# Altium PCB UHF_Reader_MultiFunction_V4.PcbDoc (part 3 of 3)
Units mm, origin at the board's own origin, x right, y up, seen from the top; angles counter-clockwise.
Board outline 74.4 x 63.4 mm, 6 copper layers (Top Layer, Internal Plane 1, Signal Layer 1, Signal Layer 2, Signal Layer 3, Bottom Layer), stack 1.21 mm thick; 381 components, 239 nets, 1152 pads, 1873 vias.
Unrouted connection lines stored in the file: 49.
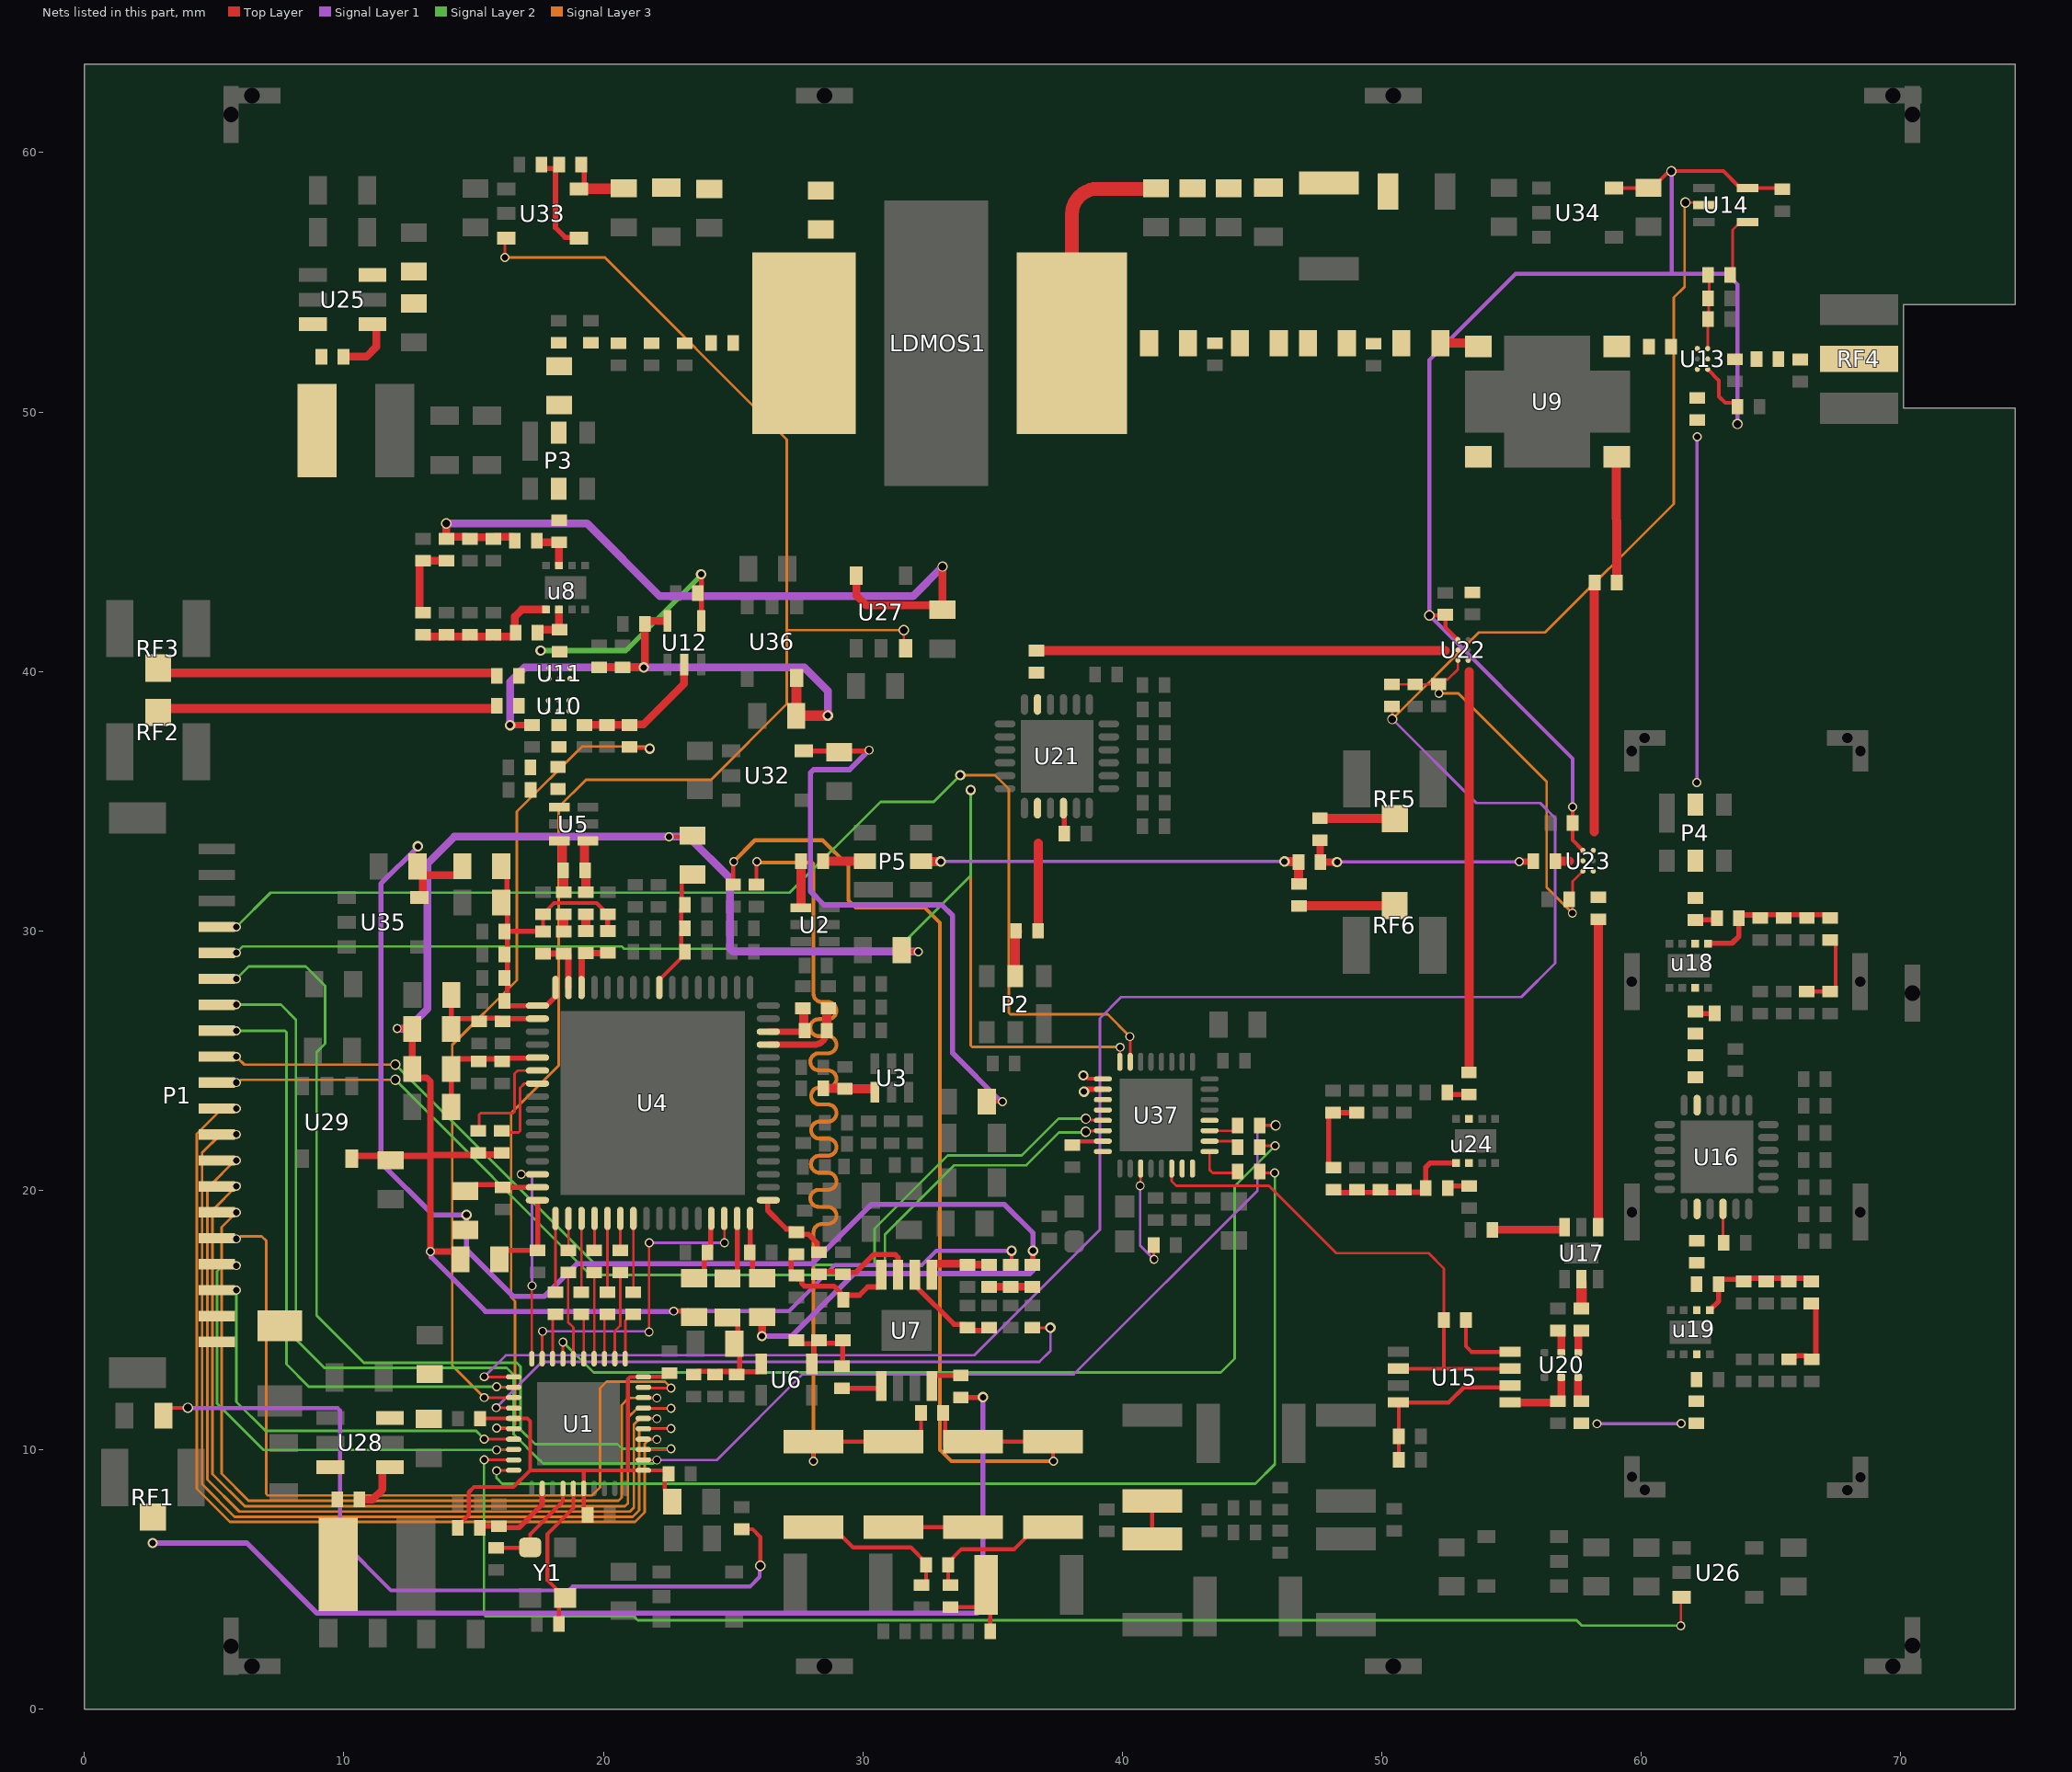
[diagram p7: the nets of this part, all layers, seen from the top]

## Via types
v1: diameter 0.4, hole 0.25, Top Layer to Bottom Layer, tented both sides, 1555 vias
v2: diameter 0.4, hole 0.25, Top Layer to Bottom Layer, tented top, 149 vias
v3: diameter 0.35, hole 0.25, Top Layer to Bottom Layer, tented both sides, 117 vias
v4: diameter 0.4, hole 0.25, Top Layer to Bottom Layer, 32 vias
v5: diameter 0.4, hole 0.3, Top Layer to Bottom Layer, tented both sides, 12 vias
v6: diameter 0.4, hole 0.3, Top Layer to Bottom Layer, 4 vias
v7: diameter 2.8, hole 2.1, Top Layer to Bottom Layer, 4 vias

## Nets (pads, with @x,y where several pads share a name; then routed paths per layer and width w, separated by ;. In a path a pad name is that pad's centre, name@x,y a point inside that pad or via, vN(x,y) a via of type N, cw(c..) or ccw(c..) an arc to the next point about the centre after c; other vN are vias at no path point) (continued)
NetC37_2: C37.2 C41.2 L17.1 L19.1 | length 41.3
  Top Layer w0.15: C37.2@25.899,31.784 25.899,32.66 v3(25.912,32.674) ; v3(28.099,9.557) 28.098,9.558 L17.1@28.098,10.313 L19.1@31.175,10.313 ; L19.1@32.048,10.023 32.24,10.215 C41.2@32.24,11.517
  Signal Layer 3 w0.15: v3(25.912,32.674) 25.953,32.634 28.041,32.634 28.099,32.575 28.099,27.659 28.099,27.584 ccw(c28.428,27.584) 28.428,27.255 28.655,27.255 cw(c28.655,26.926) 28.984,26.926 cw(c28.655,26.926) 28.655,26.597 28.305,26.597 ccw(c28.305,26.268) 27.976,26.268 ccw(c28.305,26.268) 28.305,25.939 28.655,25.939 cw(c28.655,25.61) 28.984,25.61 cw(c28.655,25.61) 28.655,25.281 28.305,25.281 ccw(c28.305,24.952) 27.976,24.952 ccw(c28.305,24.952) 28.305,24.623 28.655,24.623 cw(c28.655,24.294) 28.984,24.294 cw(c28.655,24.294) 28.655,23.965 28.334,23.965 ccw(c28.334,23.636) 28.005,23.636 ccw(c28.334,23.636) 28.334,23.307 28.655,23.307 cw(c28.655,22.978) 28.984,22.978 cw(c28.655,22.978) 28.655,22.649 28.334,22.649 ccw(c28.334,22.32) 28.005,22.32 ccw(c28.334,22.32) 28.334,21.991 28.655,21.991 cw(c28.655,21.662) 28.984,21.662 cw(c28.655,21.662) 28.655,21.333 28.331,21.333 ccw(c28.331,21.004) 28.002,21.004 ccw(c28.331,21.004) 28.331,20.675 28.655,20.675 cw(c28.655,20.346) 28.984,20.346 cw(c28.655,20.346) 28.655,20.017 28.305,20.017 ccw(c28.305,19.688) 27.976,19.688 ccw(c28.305,19.688) 28.305,19.359 28.655,19.359 cw(c28.655,19.03) 28.984,19.03 cw(c28.655,19.03) 28.655,18.701 28.428,18.701 ccw(c28.428,18.372) 28.099,18.372 28.099,17.898 v3(28.099,9.557)
NetC38_1: C38.1 C40.2 L17.2 | length 5.8
  Top Layer w0.15: L17.2@28.098,7.013 28.84,7.013 29.621,6.232 31.849,6.232 32.439,5.643 C40.2@32.439,5.561 32.439,4.963 C38.1@32.255,4.779
NetC39_2: C39.2 L16.1 U3.4 | length 2
  Top Layer w0.25: L16.1@29.291,23.93 L16.1@29.31,23.91 ; U3.4@30.338,23.91 U3.4@30.464,23.784
  Top Layer w0.353: C39.2@28.475,23.93 L16.1@29.291,23.93 ; L16.1@29.31,23.91 U3.4@30.338,23.91
NetC40_1: C40.1 C48.1 L22.2 | length 5.5
  Top Layer w0.15: C48.1@33.375,4.779 33.289,4.866 C40.1@33.289,5.561 33.289,5.649 33.807,6.168 35.835,6.168 36.681,7.013 L22.2@37.328,7.013
NetC41_1: C41.1 C47.2 L20.2 L22.1 | length 41.4
  Top Layer w0.15: C47.2@25.004,31.784 25.004,32.654 v3(25.023,32.674) ; C41.1@33.09,11.517 33.177,11.43 33.177,10.147 L20.2@33.188,10.136 ; L20.2@34.251,10.313 L22.1@37.328,10.313 37.328,9.575 v3(37.342,9.56)
  Signal Layer 3 w0.15: v3(25.023,32.674) 25.839,33.49 28.452,33.49 29.439,32.503 29.439,31.182 29.725,30.896 32.389,30.896 32.975,30.31 32.975,9.995 33.41,9.56 v3(37.342,9.56)
NetC43_2: C43.2 L21.2 U4.48 | length 2.6
  Top Layer w0.2: U4.48@25.657,18.915 25.657,17.631 C43.2@25.637,17.611 25.752,17.495 25.752,16.86 26.002,16.61 L21.2@26.119,16.61
NetC44_1: C44.1 C48.2 L23.1 | length 2.4
  Top Layer w0.15: C48.2@33.375,3.929 34.794,3.929 34.912,3.811 C44.1@34.912,2.994
NetC49_2: C49.2 L24.2 U4.45 | length 2.6
  Top Layer w0.2: L24.2@23.604,16.611 23.643,16.611 23.892,16.86 23.892,17.486 24.134,17.728 24.134,18.554 24.157,18.577 U4.45@24.157,18.915
NetC50_2: C50.2 C51.2 C52.2 L25.2 U4.8 | length 5.3
  Top Layer w0.15: U4.8@22.157,27.815 22.157,28.115 23.147,29.105 C52.2@23.147,29.196 23.004,29.339 23.004,29.954 C51.2@23.147,30.097 23.004,30.241 23.004,30.851 C50.2@23.147,30.995 23.018,31.124 23.018,31.896 23.293,32.171 L25.2@23.439,32.171
NetC55_1: C55.1 L28.1 U4.14 | length 2.4
  Top Layer w0.25: U4.14@19.157,27.815 C55.1@19.157,29.133 ; C55.1@19.177,29.133 C55.1@19.239,29.195 ; C55.1@19.239,29.053 C55.1@19.327,29.141 19.332,29.145 L28.1@20.172,29.145
NetC55_2: C55.2 L26.2 | length 0.7
  Top Layer w0.2: L26.2@19.324,30.644 L26.2@19.327,30.641
  Top Layer w0.353: C55.2@19.327,29.991 L26.2@19.327,30.641
NetC56_1: C56.1 L26.1 U5.4 | length 1.8
  Top Layer w0.2: C56.1@19.277,32.226 C56.1@19.304,32.199
  Top Layer w0.353: C56.1@19.277,32.326 U5.4@19.277,33.356 ; L26.1@19.324,31.494 C56.1@19.324,32.199
NetC56_2: C56.2 L27.1 U5.3 | length 1.8
  Top Layer w0.25: C56.2@18.427,32.226 C56.2@18.461,32.192
  Top Layer w0.353: C56.2@18.427,32.326 U5.3@18.427,33.37 ; L27.1@18.481,31.492 C56.2@18.481,32.192
NetC57_1: C57.1 L29.1 U4.15 | length 2.2
  Top Layer w0.25: L29.1@17.677,29.123 C57.1@18.472,29.123 C57.1@18.584,29.011 ; U4.15@18.657,27.815 C57.1@18.657,29.1
NetC57_2: C57.2 L27.2 | length 0.7
  Top Layer w0.25: L27.2@18.472,30.633 L27.2@18.481,30.642
  Top Layer w0.353: C57.2@18.472,29.973 L27.2@18.472,30.633
NetC58_1: C58.1 C59.2 C60.1 C61.2 C62.2 C63.2 C64.1 L28.2 L29.2 L30.2 U4.16 U4.17 | length 13.6
  Top Layer w0.15: C59.2@17.676,30.644 C59.2@17.676,30.644 17.677,30.201 ; C59.2@17.676,30.644 18.101,31.069 19.742,31.069 C60.1@20.167,30.644 ; C60.1@20.172,30.624 C60.1@20.172,30.644
  Top Layer w0.2: L30.2@16.065,32.487 16.29,32.262 16.29,31.323 C61.2@16.062,31.095 16.3,30.857 16.3,30.169 C62.2@16.185,30.053 ; U4.17@17.156,27.113 16.363,27.113 C64.1@16.185,27.291 16.308,27.414 16.308,28.064 C58.1@16.185,28.187 16.308,28.31 16.308,28.959 C63.2@16.185,29.082 16.3,29.198 16.3,29.863 C62.2@16.185,29.978 L29.2@17.671,29.978 ; U4.17@17.457,27.115 17.808,27.115 18.157,27.465 U4.16@18.157,27.815 ; L28.2@20.091,30.076 L28.2@20.172,29.995 ; L28.2@20.172,29.879 L28.2@20.172,29.995 ; C60.1@20.172,30.624 L28.2@20.172,29.995
NetC65_1: C65.1 L31.2 U4.32 | length 3.6
  Top Layer w0.2: L31.2@15.99,17.337 15.99,17.433 16.24,17.683 C65.1@17.47,17.683 17.47,19.602 U4.32@17.457,19.615
NetC66_2: C66.2 C67.2 C68.2 C69.2 L34.2 U6.4 | length 5.4
  Top Layer w0.2: C67.2@23.481,12.902 23.605,13.026 24.107,13.026 C68.2@24.231,12.902 ; C68.2@24.306,12.902 24.42,13.015 25.018,13.015 C66.2@25.132,12.902 C66.2@25.234,13.004 ; L34.2@24.884,15.1 24.932,15.1 25.182,14.85 25.182,14.223 C69.2@25.048,14.088 25.146,13.99 25.257,13.878 25.257,13.005 25.962,13.005 26.082,13.125 U6.4@26.082,13.301
NetC70_2: C70.2 C71.2 C72.2 L32.2 U4.18 | length 4.7
  Top Layer w0.2: L32.2@14.134,26.22 14.134,26.37 14.384,26.62 14.534,26.62 15.101,26.621 C71.2@15.208,26.514 15.323,26.629 15.995,26.629 C72.2@16.11,26.514 16.212,26.615 U4.18@17.457,26.615 ; L32.2@14.139,26.613 C70.2@14.139,27.53
NetC73_1: C73.1 L33.2 U4.31 | length 2.8
  Top Layer w0.2: L33.2@14.88,19.974 14.88,20.023 15.08,20.223 15.997,20.223 C73.1@16.109,20.111 ; C73.1@16.109,20.115 U4.31@17.457,20.115
NetC75_2: C75.2 C76.2 C77.2 L35.2 U4.21 | length 5.2
  Top Layer w0.2: C75.2@14.134,23.216 L35.2@14.134,24.677 ; L35.2@14.134,24.719 14.134,24.815 14.384,25.065 15.102,25.065 C76.2@15.201,24.966 15.3,25.065 16.005,25.065 C77.2@16.103,24.967 ; C77.2@16.107,24.963 16.236,25.091 17.094,25.091 17.119,25.115 U4.21@17.457,25.115
NetC78_2: C78.2 R19.2 U7.1 | length 2.6
  Top Layer w0.3: U7.1@32.658,16.751 32.658,17.126 32.708,17.176 33.979,17.176 C78.2@34.028,17.127 R19.2@34.869,17.127
NetC79_1: C79.1 RF1.1 | length 42.2
  Top Layer w0.2: C79.1@33.777,12.017 34.623,12.017 v1(34.632,12.026)
  Signal Layer 1 w0.2: v1(2.632,6.401) 6.257,6.401 8.958,3.7 34.406,3.7 34.632,3.926 v1(34.632,12.026)
NetC79_2: C79.2 U7.8 | length 1.5
  Top Layer w0.2: U7.8@32.658,12.451 32.658,12.767 32.758,12.867 33.716,12.867 C79.2@33.782,12.801
NetC80_1: C80.1 C82.2 U7.3 | length 4.2
  Top Layer w0.2: C82.2@28.313,16.76 28.419,16.866 29.121,16.866 C80.1@29.227,16.76 ; C80.1@29.227,16.701 29.361,16.835 29.733,16.835 30.424,17.526 31.24,17.526 31.357,17.409 U7.3@31.357,16.751
NetC81_2: C81.2 R18.2 U7.2 | length 4
  Top Layer w0.2: U7.2@32.008,16.751 32.108,16.651 32.108,16.243 33.517,14.834 33.914,14.834 34.156,14.592 34.752,14.592 R18.2@34.868,14.709
NetC83_2: C83.2 C85.2 R20.2 U7.4 | length 5.8
  Top Layer w0.2: 27.237,17.293 27.237,16.959 27.239,16.957 27.239,16.842 27.364,16.717 27.514,16.717 R20.2@27.639,16.592 ; 27.238,17.294 27.238,17.41 27.363,17.535 C83.2@27.438,17.535 ; R20.2@27.466,16.601 27.475,16.592 R20.2@27.639,16.592 ; U7.4@30.707,16.751 30.707,16.376 30.607,16.276 30.19,16.276 29.871,15.956 29.373,15.956 29.248,15.831 C85.2@29.248,15.782 29.123,15.907 29.123,16.068 28.891,16.301 27.756,16.301 27.639,16.418 R20.2@27.639,16.592
NetC84_1: C84.1 U7.5 | length 1.4
  Top Layer w0.2: C84.1@29.202,12.367 30.598,12.367 U7.5@30.607,12.376
NetC87_1: C87.1 R25.1 R26.1 | length 3.1
  Top Layer w0.3: R26.1@13.049,42.262 12.995,42.262 12.92,42.337 12.92,44.188 12.995,44.263 13.208,44.263 R25.1@13.952,44.263
NetC88_2: C88.2 C90.2 C93.2 L36.2 R26.2 u8.1 | length 6
  Top Layer w0.3: R26.2@13.049,41.412 13.123,41.338 13.878,41.338 C88.2@13.952,41.412 14.026,41.338 14.78,41.338 C90.2@14.854,41.412 14.928,41.338 15.682,41.338 C93.2@15.756,41.412 15.83,41.338 16.467,41.338 16.475,41.345 16.541,41.345 16.616,41.42 L36.2@16.616,41.495 ; L36.2@16.591,41.359 16.591,42.117 16.855,42.381 u8.1@17.792,42.381
NetC89_2: C89.2 C91.2 C197.1 L37.2 R25.2 U27.5 | length 30.2
  Top Layer w0.3: v5(13.949,45.701) 13.951,45.7 13.951,45.221 R25.2@13.952,45.113 R25.2@13.952,45.113 14.027,45.188 14.272,45.188 14.278,45.193 14.699,45.193 14.779,45.113 C91.2@14.854,45.113 14.92,45.179 15.69,45.179 C89.2@15.756,45.113 15.831,45.188 16.076,45.188 16.082,45.193 16.516,45.193 16.591,45.118 L37.2@16.591,45.046 ; U27.5@29.749,43.69 29.749,42.925 30.125,42.55 32.896,42.55 C197.1@33.069,42.377 33.076,42.384 v5(33.076,44.043)
  Signal Layer 1 w0.3: v5@13.996,45.701 19.374,45.701 22.175,42.9 31.933,42.9 33.058,44.025 v5@33.1,44.025
NetC92_2: C92.2 C95.2 C209.1 R28.2 RX1.2 U33.5 | length 2.3
  Top Layer w0.2: RX1.2@19.257,59.49 19.257,58.75 U33.5@19.405,58.602
  Top Layer w0.4: U33.5@19.405,58.602 C209.1@20.766,58.602 ; C209.1@20.893,58.602 C209.1@20.909,58.619
NetC94_1: C94.1 C96.2 C97.1 C98.2 C99.2 L38.1 LDMOS1.1 R27.2 | length 8.5
  Top Layer w0.53: LDMOS1.1@38.056,52.645 38.056,57.611 cw(c39.048,57.611) 39.048,58.602 41.031,58.602 ccw(c41.031,58.623) C98.2@41.051,58.623
NetC100_2: C100.2 C108.1 L38.2
NetC101_1: C101.1 U9.4
NetC104_1: C104.1 L36.1 u8.2 | length 1.7
  Top Layer w0.3: L36.1@17.441,41.434 17.441,41.509 17.541,41.61 18.292,41.61 u8.2@18.292,42.381
NetC104_2: C104.2 U11.5
NetC105_1: C105.1 P3.5
NetC105_2: C105.2 L37.1 u8.7 | length 1.8
  Top Layer w0.3: L37.1@17.441,45.046 17.506,44.98 C105.2@18.289,44.98 18.292,44.977 u8.7@18.292,44.081
NetC106_1: C106.1 P3.2
NetC106_2: C106.2 C107.1 C110.1 C111.1 C113.2 C114.2 C115.2
NetC107_2: C107.2 LDMOS1.2 R28.1
NetC108_2: C108.2 L39.1
NetC109_1: C109.1 C112.1 L39.2
NetC109_2: C109.2 U9.1 | length 1.1
  Top Layer w0.353: C109.2@52.259,52.652 U9.1@53.406,52.652
NetC116_1: C116.1 U10.5
NetC116_2: C116.2 R29.2 R31.2
NetC117_2: C117.2 U9.2
NetC120_1: C120.1 RF2.1 | length 13.2
  Top Layer w0.353: RF2.1@2.837,38.423 2.985,38.571 15.85,38.571 15.898,38.62 C120.1@15.898,38.682
NetC120_2: C120.2 U10.3
NetC121_1: C121.1 RF3.1 | length 13.3
  Top Layer w0.353: RF3.1@2.757,40.076 2.89,39.943 15.85,39.943 15.898,39.895 C121.1@15.898,39.832
NetC121_2: C121.2 U11.1
NetC124_1: C124.1 U13.3
NetC124_2: C124.2 P4.2 | length 13.4
  Top Layer w0.15: P4.2@62.085,34.857 P4.2@62.137,34.909
  Signal Layer 1 w0.121: v3(62.137,35.722) 62.148,35.733 62.148,49.032 v3(62.159,49.043)
NetC125_1: C125.1 C127.2 U13.5
NetC126_1: C126.1 C127.1 RF4.1
NetC134_2: C134.2 R37.1 U15.2 U15.8 | length 7
  Top Layer w0.15: R37.1@50.656,9.605 50.656,11.696 50.531,11.82 52.581,11.82 53.164,12.403 U15.2@55.065,12.403
NetC136_1: C136.1 R38.1 R40.1 | length 3.1
  Top Layer w0.15: R38.1@66.385,27.662 67.342,27.662 67.492,27.812 67.492,29.495 67.342,29.645 R40.1@67.285,29.645
NetC137_1: C137.1 R39.1 R41.1 | length 3.3
  Top Layer w0.2: R39.1@65.695,13.48 65.82,13.605 65.998,13.605 66.012,13.619 66.352,13.619 66.491,13.48 C137.1@66.566,13.48 ; R41.1@66.554,15.639 66.608,15.639 66.733,15.514 66.733,13.605 C137.1@66.608,13.48
NetC140_2: C140.2 U15.4 | length 3
  Top Layer w0.15: C140.2@53.247,15.002 53.247,13.984 53.461,13.77 U15.4@55.131,13.77
NetC141_2: C141.2 C145.2 C149.2 L40.2 R40.2 u18.1 | length 5.9
  Top Layer w0.2: u18.1@62.584,29.498 62.606,29.52 63.5,29.52 63.768,29.788 L40.2@63.768,30.492 63.888,30.612 64.472,30.612 C149.2@64.589,30.495 64.714,30.62 64.905,30.62 ; 64.906,30.621 65.287,30.621 65.412,30.495 C145.2@65.487,30.495 65.612,30.62 65.804,30.62 ; 65.804,30.621 66.185,30.621 66.311,30.495 C141.2@66.386,30.495 66.511,30.62 66.703,30.62 ; 66.703,30.621 67.084,30.621 67.21,30.495 R40.2@67.285,30.495
NetC142_2: C142.2 C146.2 C150.2 L41.2 R41.2 u19.1 | length 5.2
  Top Layer w0.2: u19.1@62.642,15.38 62.988,15.726 L41.2@62.988,16.376 62.988,16.443 63.113,16.568 63.876,16.568 C150.2@63.955,16.489 64.079,16.613 64.698,16.613 C146.2@64.821,16.489 64.945,16.613 65.564,16.613 C142.2@65.688,16.489 65.812,16.613 66.431,16.613 R41.2@66.555,16.489
NetC151_2: C151.2 U17.6 | length 2.8
  Top Layer w0.3: C151.2@54.262,18.477 54.263,18.476 U17.6@57.045,18.476
NetC153_1: C153.1 L40.1 u18.2 | length 0.9
  Top Layer w0.2: C153.1@62.093,30.42 62.847,30.42 L40.1@62.918,30.492
NetC154_1: C154.1 C155.2 | length 0.1
  Top Layer w0.23: C155.2@62.071,25.218 C155.2@62.13,25.158
NetC154_2: C154.2 L42.1 u18.7 | length 0.8
  Top Layer w0.2: C154.2@62.084,26.816 L42.1@62.836,26.817
NetC155_1: C155.1 U16.5
NetC156_1: C156.1 L41.1 u19.2
NetC156_2: C156.2 U16.14
NetC157_1: C157.1 C158.2 | length 3.3
  Top Layer w0.23: C158.2@57.699,11.02 C158.2@57.719,11.001
  Signal Layer 1 w0.121: v3@58.298,11.009 v3(61.544,11.009)
  Signal Layer 1 w0.23: v3(58.29,11.001) v3@58.298,11.009
NetC157_2: C157.2 L43.1 u19.7
NetC158_1: C158.1 U20.1 | length 1
  Top Layer w0.3: U20.1@57.568,12.787 57.568,12.002 C158.1@57.699,11.87
NetC159_1: C159.1 U17.2 | length 1
  Top Layer w0.4: U17.2@57.695,16.476 57.7,16.471 C159.1@57.7,15.486
NetC159_2: C159.2 U20.6 | length 0.9
  Top Layer w0.3: U20.6@57.574,13.744 57.574,14.536 57.629,14.59 C159.2@57.699,14.59
NetC160_2: C160.2 U17.4 | length 11.9
  Top Layer w0.353: U17.4@58.348,18.579 C160.2@58.348,30.441
NetC168_1: C168.1 R44.1 R45.1 | length 3.2
  Top Layer w0.2: R45.1@48.138,20.871 48.076,20.871 47.951,20.996 47.951,22.868 48.076,22.993 R44.1@49.037,22.993
NetC169_2: C169.2 C171.2 C177.2 L44.2 R45.2 u24.1 | length 6
  Top Layer w0.2: R45.2@48.138,20.021 48.254,19.906 48.928,19.906 C169.2@49.044,20.021 49.149,19.917 49.845,19.917 C171.2@49.95,20.021 50.066,19.906 50.74,19.906 C177.2@50.856,20.021 50.949,19.928 51.567,19.928 51.692,20.053 51.692,20.886 51.853,21.047 u24.1@52.856,21.047
NetC176_1: C176.1 U23.3 | length 9.6
  Top Layer w0.353: 58.192,33.817 58.192,43.409 C176.1@58.208,43.425
NetC178_1: C178.1 U21.5
NetC178_2: C178.2 U22.5 | length 15.8
  Top Layer w0.353: C178.2@36.691,40.8 52.457,40.8
NetC179_1: C179.1 P2.5 | length 1.8
  Top Layer w0.353: P2.5@35.881,28.248 35.881,29.899 cw(c35.957,29.899) C179.1@35.957,29.976
NetC179_2: C179.2 U21.14 | length 3.4
  Top Layer w0.353: C179.2@36.757,30.001 36.757,33.376
NetC180_1: C180.1 U2.1 | length 1.8
  Top Layer w0.353: U2.1@27.614,30.889 27.614,32.685 C180.1@27.618,32.689
NetC180_2: C180.2 P5.2 | length 1.6
  Top Layer w0.353: C180.2@28.468,32.689 30.081,32.689 P5.2@30.087,32.683
NetC181_1: C181.1 R46.1 R49.2 | length 9
  Top Layer w0.24: v3(55.303,32.672) C181.1@55.822,32.672
  Top Layer w0.28: R46.1@47.619,33.491 47.63,33.48 47.63,32.62 R49.2@47.65,32.6 ; R49.2@47.641,32.656 48.219,32.656 v1@48.225,32.65
  Signal Layer 1 w0.121: v1(48.275,32.65) 48.286,32.661 55.289,32.661 v3@55.3,32.65
NetC181_2: C181.2 U23.5 | length 0.5
  Top Layer w0.353: C181.2@56.688,32.682 57.228,32.682
NetC182_1: C182.1 L44.1 u24.2 | length 0.9
  Top Layer w0.2: L44.1@52.542,20.091 52.612,20.161 C182.1@53.37,20.161
NetC183_1: C183.1 U22.1 | length 15.5
  Top Layer w0.353: C183.1@53.361,24.543 53.361,39.997
NetC183_2: C183.2 L45.1 u24.7 | length 0.9
  Top Layer w0.2: L45.1@52.532,23.765 52.604,23.693 C183.2@53.361,23.693
NetC186_1: C186.1 L46.2 U25.6
NetC186_2: C186.2 U25.1 | length 2.4
  Top Layer w0.3: C186.2@9.984,52.129 10.87,52.129 11.253,52.512 11.253,53.228 U25.1@11.101,53.38
NetC193_1: C193.1 L47.2 U28.6
NetC193_2: C193.2 U28.1 | length 2.2
  Top Layer w0.3: C193.2@10.591,8.081 11.106,8.081 11.485,8.46 11.485,9.209 11.683,9.408 U28.1@11.77,9.408
NetC207_1: C207.1 L4.2 U32.5 | length 23.9
  Top Layer w0.15: L4.2@34.922,23.414 34.923,23.413 v3(35.387,23.413)
  Top Layer w0.2: U32.5@27.722,36.934 v3@30.209,36.934
  Signal Layer 1 w0.2: v3(30.24,36.965) 29.487,36.211 28.1,36.211 27.982,36.094 27.982,31.526 28.507,31.002 33.046,31.002 33.457,30.59 33.457,25.291 v3@35.311,23.437
NetD1_1: D1.1 R52.1 | length 31.2
  Top Layer w0.15: D1.1@3.246,11.615 v5(3.982,11.615) ; R52.1@25.325,6.936 25.751,6.936 26.05,6.637 v5(26.05,5.526)
  Signal Layer 1 w0.15: v5(3.982,11.615) 3.996,11.601 9.762,11.601 9.85,11.513 9.85,6.539 11.813,4.576 18.657,4.576 18.806,4.725 25.649,4.725 26.025,5.101 26.025,5.501 v5(26.05,5.526)
NetF1_1: F1.1 P1.1 P1.2
NetL9_2: L9.2 L12.1 | length 1.5
  Top Layer w0.15: L9.2@41.152,6.564 L12.1@41.152,8.029
NetL19_2: L19.2 L20.1 | length 3.1
  Top Layer w0.15: L19.2@31.175,7.013 L20.1@34.251,7.013
NetP5_5: P5.5 R48.1 R49.1 | length 15.2
  Top Layer w0.353: P5.5@32.237,32.683 32.245,32.675 v1@32.9,32.675 ; v1@46.35,32.675 46.772,32.675 R49.1@46.791,32.656 46.798,32.648 46.798,31.827 R48.1@46.825,31.8
  Signal Layer 1 w0.121: v1@33.025,32.7 33.05,32.675 v1(46.25,32.675)
  other v1: 33,32.675
NetR1_1: R1.1 U1.37 | length 36.7
  Top Layer w0.1: U1.37@18.442,13.506 18.442,14.149 v3(18.445,14.152) ; R1.1@45.295,21.669 45.343,21.717 v3(45.891,21.717)
  Signal Layer 2 w0.1: v3(18.445,14.152) 19.621,12.976 43.794,12.976 44.327,13.51 44.327,20.153 v3(45.891,21.717)
NetR2_2: R2.2 U1.10 | length 43.3
  Top Layer w0.1: v3@15.763,9.193 15.776,9.206 U1.10@16.542,9.206 ; R2.2@45.295,20.724 45.344,20.675 v3(45.873,20.675)
  Signal Layer 2 w0.1: v3(15.879,9.193) 15.879,8.909 16.098,8.69 45.13,8.69 45.882,9.442 v3@45.882,20.659
NetR5_2: R5.2 U4.39 | length 2.9
  Top Layer w0.1: R5.2@21.113,16.074 21.157,16.118 U4.39@21.157,18.915
NetR6_2: R6.2 U4.38 | length 1.2
  Top Layer w0.1: R6.2@20.65,17.683 20.657,17.69 U4.38@20.657,18.915
NetR7_2: R7.2 U4.37 | length 2.9
  Top Layer w0.1: R7.2@20.132,16.074 20.157,16.099 U4.37@20.157,18.915
NetR8_2: R8.2 U4.36 | length 1.2
  Top Layer w0.1: R8.2@19.648,17.683 19.657,17.692 U4.36@19.657,18.915
NetR9_2: R9.2 U4.35 | length 2.8
  Top Layer w0.1: R9.2@19.15,16.074 19.157,16.081 U4.35@19.157,18.915
NetR10_2: R10.2 U4.34 | length 1.2
  Top Layer w0.1: R10.2@18.645,17.683 18.657,17.695 U4.34@18.657,18.915
NetR11_1: R11.1 U1.38 | length 1.8
  Top Layer w0.1: U1.38@18.042,13.506 18.042,15.117 R11.1@18.149,15.224
NetR11_2: R11.2 U4.33 | length 2.8
  Top Layer w0.1: R11.2@18.157,16.085 U4.33@18.157,18.915
NetR12_2: R12.2 U4.22 | length 4.4
  Top Layer w0.1: R12.2@15.208,22.292 15.208,22.916 15.266,22.975 16.522,22.975 16.581,23.034 16.581,24.499 16.697,24.615 U4.22@17.457,24.615
NetR13_2: R13.2 U4.23 | length 3.1
  Top Layer w0.1: R13.2@16.072,22.225 16.735,22.225 16.794,22.284 16.794,23.95 16.959,24.115 U4.23@17.457,24.115
NetR16_2: R16.2 R17.2 R19.1 | length 1.6
  Top Layer w0.3: R19.1@34.909,16.268 34.918,16.277 R16.2@36.527,16.277
NetR22_1: R22.1 U1.4 | length 24.5
  Top Layer w0.1: v3(15.867,11.62) 15.876,11.611 16.507,11.611 U1.4@16.51,11.608 ; R22.1@36.528,14.709 36.535,14.702 37.19,14.702 v1@37.211,14.681
  Signal Layer 1 w0.1: v3(15.867,11.62) 17.632,13.386 36.805,13.386 37.231,13.813 37.231,14.676 v1@37.262,14.707
  other v1: 37.231,14.702
NetR24_1: R24.1 U1.3 | length 32.3
  Top Layer w0.1: v3(15.412,12.011) 15.414,12.009 16.555,12.009 U1.3@16.561,12.014 ; R24.1@21.002,37.085 21.063,37.024 21.777,37.024 v1@21.793,37.008
  Signal Layer 3 w0.1: v3(15.412,12.011) 14.173,13.25 14.173,25.604 16.662,28.094 16.662,34.595 19.177,37.109 21.576,37.109 21.605,37.081 21.728,37.081 v1(21.785,37.024)
NetR29_1: R29.1 R30.2 U5.1
NetR36_1: R36.1 U15.1 U20.2 | length 2.8
  Top Layer w0.3: U15.1@54.942,11.825 56.745,11.825 R36.1@56.79,11.87 56.921,12.001 U20.2@56.921,12.791
NetR42_2: R42.2 U20.5 | length 0.9
  Top Layer w0.3: R42.2@56.79,14.59 56.921,14.459 U20.5@56.921,13.741
NetR43_1: R43.1 U16.16 | length 1.3
  Top Layer w0.1: U16.16@63.153,19.283 63.153,18.002 R43.1@63.175,17.98
NetR46_2: R46.2 RF5.1 | length 2.9
  Top Layer w0.353: R46.2@47.6,34.35 47.616,34.334 50.498,34.334 RF5.1@50.505,34.328
NetR47_1: R47.1 U21.16 | length 1
  Top Layer w0.2: U21.16@37.732,34.728 37.732,34.446 37.766,34.412 R47.1@37.766,33.756
NetR48_2: R48.2 RF6.1 | length 3.7
  Top Layer w0.353: R48.2@46.806,30.959 46.812,30.966 50.409,30.966 RF6.1@50.45,30.925
NetR50_1: R50.1 R51.2 U25.3
NetR53_1: R53.1 R54.2 U28.3
NetR57_2: R57.2 U37.31 | length 1.4
  Top Layer w0.15: R57.2@38.008,21.894 R57.2@38.091,21.811 ; R57.2@38.098,21.77 R57.2@38.069,21.741 38.213,21.885 38.977,21.885 38.987,21.894 U37.31@39.25,21.894
NetRX1_1: RX1.1 RX2.1 U33.4 | length 4.2
  Top Layer w0.2: RX2.1@17.616,59.533 17.616,59.511 17.741,59.386 RX1.1@18.152,59.386 ; RX1.1@18.298,59.532 RX1.1@18.152,59.386 ; U33.4@19.057,56.701 19.027,56.732 18.525,56.732 18.152,57.104 RX1.1@18.152,59.386
NetU1_9: U1.9 U26.3 | length 54.5
  Top Layer w0.1: v3(15.412,9.612) 15.418,9.606 U1.9@16.542,9.606 ; v3(61.529,3.218) 61.529,4.285 U26.3@61.561,4.317
  Signal Layer 2 w0.1: v3(15.412,9.612) 15.401,9.602 15.401,3.635 15.46,3.576 21.177,3.576 21.327,3.426 57.509,3.426 57.713,3.221 58.381,3.221 58.382,3.223 v3@61.525,3.223
NetU10_1: U10.1 U11.3
NIRQ0: U1.40 U4.30 | length 8.1
  Top Layer w0.1: v3(16.833,20.614) 17.363,20.614 17.377,20.6 17.425,20.648 U4.30@17.457,20.615 ; U1.40@17.242,13.506 17.244,13.508 17.244,16.318 v3(17.246,16.32)
  Signal Layer 1 w0.1: v3(16.833,20.614) 17.108,20.614 17.246,20.476 v3(17.246,16.32)
NRST: R56.1 U37.3 | length 4.3
  Top Layer w0.1: v3(40.688,20.169) 40.707,20.188 U37.3@40.707,20.837 ; R56.1@41.211,17.892 41.211,17.347 v3(41.222,17.336)
  Signal Layer 1 w0.1: v3(40.688,20.169) 40.688,17.87 41.182,17.376 v3@41.182,17.276
OSC_IN: C7.2 U1.14 Y1.1 | length 4.1
  Top Layer w0.15: C7.2@15.873,6.217 17.16,6.217 Y1.1@17.179,6.235 17.179,6.744 18.442,8.007 U1.14@18.442,8.506
OSC_OUT: C6.1 U1.15 Y1.3 | length 6
  Top Layer w0.15: C6.1@18.288,3.28 18.288,4.044 Y1.3@18.529,4.285 17.848,4.966 17.848,6.752 18.842,7.747 U1.15@18.842,8.506
PA0: C140.1 U15.3 U15.6 U37.6 | length 20.8
  Top Layer w0.1: U37.6@41.907,20.837 41.907,20.347 42.085,20.169 45.65,20.169 48.243,17.576 51.804,17.576 52.397,16.983 C140.1@52.397,15.002
  Top Layer w0.15: U15.6@50.531,13.12 52.397,13.12 U15.3@55.131,13.12 ; 52.389,13.133 52.397,13.14 52.397,14.922 C140.1@52.397,15.002
PA1: U37.7
PA2: U37.8
PA3: R2.1 U37.9 | length 1.9
  Top Layer w0.1: U37.9@43.364,21.494 43.364,20.787 43.482,20.669 44.39,20.669 R2.1@44.445,20.724
PA4: R1.2 U37.10 | length 1.2
  Top Layer w0.1: U37.10@43.364,21.894 44.265,21.894 R1.2@44.459,21.701
PA5: R55.1 U37.11 | length 1.2
  Top Layer w0.1: U37.11@43.364,22.294 44.27,22.294 44.445,22.469 R55.1@44.445,22.497
PA6: U37.12
PA13: P1.17 U37.23 | length 47
  Top Layer w0.1: v3(40.292,25.925) 40.307,25.909 U37.23@40.307,24.951
  Signal Layer 2 w0.1: v3(5.855,30.152) 7.174,31.471 27.177,31.471 30.681,34.975 32.731,34.975 v1(33.757,36.001)
  Signal Layer 3 w0.1: v1@33.807,36.026 33.832,36.001 35.099,36.001 35.632,35.468 35.632,26.84 35.691,26.781 39.435,26.781 40.257,25.959 v3@40.257,25.926
PA14: P1.16 U37.24 | length 48.9
  Top Layer w0.1: U37.24@39.907,24.951 39.907,25.504 v3(39.919,25.516)
  Signal Layer 2 w0.1: v3(5.855,29.152) 6.104,29.401 20.704,29.401 20.797,29.307 31.339,29.307 34.157,32.126 v1@34.157,35.344
  Signal Layer 3 w0.1: v1@34.157,35.325 34.157,25.585 34.216,25.526 v3@39.932,25.526
  other v1: 34.157,35.426
PA15: U37.25 | length 0.8
  Top Layer w0.15: v1(38.5,24.425) 38.568,24.425 38.689,24.304 39.241,24.304 U37.25@39.25,24.294
PB3: U37.26 | length 0.8
  Top Layer w0.2: v1(38.525,23.8) 38.579,23.8 38.673,23.894 U37.26@39.25,23.894
PB4: U37.27
PB5: U37.28
PB6: P1.12 U37.29 | length 39.8
  Top Layer w0.1: v6(38.59,22.76) 38.636,22.713 39.231,22.713 U37.29@39.25,22.694
  Signal Layer 2 w0.1: v6(11.984,24.841) 19.706,17.12 30.378,17.12 30.458,17.199 30.458,18.521 33.276,21.339 36.121,21.339 37.542,22.76 v6(38.59,22.76)
  Signal Layer 3 w0.1: v3@5.918,25.121 5.918,25.089 6.166,24.841 v6(11.984,24.841)
  other v3: 5.855,25.152
PB7: P1.11 U37.30 | length 39.7
  Top Layer w0.1: v6(38.59,22.26) 38.608,22.277 39.233,22.277 U37.30@39.25,22.294
  Signal Layer 2 w0.1: v6(11.984,24.257) 19.505,16.736 30.795,16.736 30.853,16.795 30.853,18.292 33.527,20.965 36.307,20.965 37.567,22.225 38.556,22.225 v6(38.59,22.26)
  Signal Layer 3 w0.1: v3@5.918,24.181 5.951,24.181 6.028,24.257 v6(11.984,24.257)
  other v3: 5.855,24.152
PB8: U37.32
PC7: P1.13 U1.2 | length 24
  Top Layer w0.1: v3@15.776,12.406 U1.2@16.542,12.406
  Signal Layer 2 w0.1: v3@5.865,26.151 7.724,26.151 7.782,26.092 7.782,13.293 8.645,12.43 v3(15.879,12.43)
  other v3: 5.855,26.152
PE1: P1.14 R55.2 U1.22 | length 64
  Top Layer w0.1: U1.22@21.542,9.606 21.547,9.601 v3(22.063,9.601) ; R55.2@45.295,22.497 45.9,22.497 v5(45.909,22.506)
  Signal Layer 1 w0.1: v3(22.063,9.601) 24.376,9.601 27.676,12.901 38.132,12.901 45.207,19.976 45.207,22.417 45.296,22.506 v5(45.909,22.506)
  Signal Layer 2 w0.1: v3@5.775,27.151 7.574,27.151 8.15,26.575 8.15,14.25 9.25,13.15 16.281,13.15 16.542,12.889 16.542,10.597 17.538,9.601 17.546,9.601 17.675,9.473 21.934,9.473 v3(22.063,9.601)
  other v3: 5.855,27.152
PE5: P1.15 U1.23 | length 35.1
  Top Layer w0.1: U1.23@21.542,10.006 22.609,10.006 v3@22.636,10.033
  Signal Layer 2 w0.1: v3(5.855,28.152) 6.328,28.625 8.525,28.625 9.275,27.875 9.275,25.647 8.948,25.32 8.948,15.177 10.775,13.35 16.661,13.35 16.813,13.198 16.813,10.771 17.374,10.21 20.547,10.21 20.725,10.033 v3(22.61,10.033)
PF0/TX0: P1.3 U1.7 | length 15.7
  Top Layer w0.1: v3(15.412,10.411) 15.417,10.406 U1.7@16.542,10.406
  Signal Layer 2 w0.1: v3@5.857,16.215 5.857,11.846 6.978,10.725 15.098,10.725 v3(15.412,10.411)
  other v3: 5.855,16.152
PF1/RX0: P1.4 U1.8 | length 18.2
  Top Layer w0.1: v3@15.763,9.993 15.776,10.006 U1.8@16.542,10.006
  Signal Layer 2 w0.1: v3@5.8,17.097 5.328,17.097 5.107,16.876 5.107,11.784 6.898,9.993 v3(15.879,9.993)
  other v3: 5.855,17.097
QSPI_D0: R6.1 U1.32 | length 3.4
  Top Layer w0.1: U1.32@20.442,13.506 20.442,14.572 20.65,14.78 R6.1@20.65,16.833
QSPI_D1: R7.1 U1.33 | length 1.7
  Top Layer w0.1: U1.33@20.04,13.471 U1.33@20.04,13.504 ; U1.33@20.042,13.506 U1.33@20.04,13.504 ; R7.1@20.097,15.169 20.04,15.112 U1.33@20.04,13.504
QSPI_D2: R8.1 U1.34 | length 3.4
  Top Layer w0.1: R8.1@19.648,16.833 19.65,16.831 U1.34@19.65,13.432
QSPI_D3: R9.1 U1.35 | length 1.8
  Top Layer w0.1: R9.1@19.15,15.224 19.242,15.132 U1.35@19.242,13.506 U1.35@19.227,13.522
QSPI_SCK: R5.1 U1.31 | length 1.9
  Top Layer w0.1: U1.31@20.842,13.506 20.85,13.506 20.85,14.975 21.099,15.224 R5.1@21.153,15.224
QSPI_SSN: R10.1 U1.36 | length 3.4
  Top Layer w0.1: R10.1@18.643,16.831 18.643,14.913 18.842,14.714 U1.36@18.842,13.506
RD_RX_N: C21.2 L6.1 U4.62 | length 2.3
  Top Layer w0.25: U4.62@26.357,26.115 C21.2@27.661,26.115
  Top Layer w0.26: C21.2@27.661,26.115 ccw(c27.661,26.253) C21.2@27.759,26.156 cw(c27.923,26.32) C21.2@27.691,26.32
  Top Layer w0.353: L6.1@27.691,26.863 27.718,26.836 27.718,26.197 C21.2@27.759,26.156
RD_RX_P: C21.1 L11.1 U4.61 | length 3.6
  Top Layer w0.25: U4.61@26.357,25.615 28.125,25.615 ccw(c28.125,26.088) C21.1@28.593,26.154 ; C21.1@28.609,26.156 ccw(c28.609,26.219) C21.1@28.672,26.219
  Top Layer w0.353: C21.1@28.609,26.156 28.609,26.965 28.657,27.013 L11.1@28.672,27.013
RF_Ann: C117.1 U13.1
RX1: C160.1 U23.1
RX2: C176.2 U9.3 | length 4.6
  Top Layer w0.353: U9.3@59.043,48.15 C176.2@59.058,43.552
RX_in: C153.2 P4.5
SPI_CS: P1.5 U1.29 | length 31.9
  Top Layer w0.1: U1.29@21.542,12.406 21.574,12.374 21.585,12.385 21.591,12.379 v3(22.61,12.379) v3@22.644,12.379
  Signal Layer 3 w0.1: v3@5.885,18.226 5.938,18.174 5.97,18.174 6.023,18.226 6.832,18.226 7.005,18.054 7.005,8.295 7.063,8.236 19.56,8.236 19.87,8.545 19.87,12.367 20.124,12.621 22.368,12.621 v3(22.61,12.379)
  other v3: 5.855,18.126
SPI_SCLK: P1.8 U1.26 | length 34.7
  Top Layer w0.1: U1.26@21.542,11.206 22.103,11.206 v3@22.128,11.231
  Signal Layer 3 w0.1: v3@5.907,21.251 4.732,20.076 4.732,8.854 5.97,7.617 6.21,7.617 21.026,7.617 21.176,7.767 21.176,10.973 21.399,11.196 v3(22.063,11.196)
  other v3: 5.855,21.152
SPI_SDI: P1.6 U1.28 | length 31.8
  Top Layer w0.1: U1.28@21.542,12.006 22.05,12.006 v3(22.063,11.993)
  Signal Layer 3 w0.1: v3(5.855,19.151) 5.282,18.579 5.282,9.077 6.323,8.036 20.578,8.036 20.705,8.163 20.705,11.719 20.979,11.993 v3(22.063,11.993)
SPI_SDO: P1.7 U1.27 | length 34.4
  Top Layer w0.1: U1.27@21.542,11.606 22.63,11.606 v3@22.636,11.612
  Signal Layer 3 w0.1: v3@5.958,20.252 5.857,20.15 4.932,19.226 4.932,9.065 6.18,7.817 20.832,7.817 20.942,7.927 20.942,11.233 21.306,11.597 v3(22.61,11.597)
  other v3: 5.855,20.152
SWCLK: P1.9 U1.25 | length 37.3
  Top Layer w0.1: U1.25@21.545,10.808 22.56,10.808 v3@22.61,10.758
  Signal Layer 3 w0.1: v3(5.855,22.152) 5.241,22.152 4.532,21.443 4.532,8.674 5.79,7.417 21.132,7.417 21.379,7.664 21.379,10.743 21.451,10.815 v3(22.61,10.815)
SWDIO: P1.10 U1.24 | length 37.2
  Top Layer w0.1: U1.24@21.542,10.406 22.055,10.406 v3(22.063,10.398)
  Signal Layer 3 w0.1: v3@5.807,23.252 5.408,23.252 4.332,22.176 4.332,8.495 5.61,7.217 21.215,7.217 21.594,7.597 21.594,10.22 21.772,10.398 v3(22.063,10.398)
  other v3: 5.855,23.152
TCXO: C82.1 C83.1 U4.49 | length 3.2
  Top Layer w0.2: U4.49@26.332,19.592 26.332,19.226 27.048,18.51 27.313,18.51 27.52,18.303 27.905,18.303 28.241,17.968 28.241,17.632 C82.1@28.313,17.56
TCXO_EN: U1.39 U4.46 | length 12.5
  Top Layer w0.1: U1.39@17.642,13.506 17.642,14.549 v3(17.657,14.563) ; v3(21.76,14.541) 21.76,17.974 v3(21.767,17.981) ; U4.46@24.657,18.915 24.668,18.905 v3(24.668,17.981)
  Signal Layer 1 w0.1: v3(17.657,14.563) 21.738,14.563 v3(21.76,14.541) ; v3(21.767,17.981) v3(24.668,17.981)
TCXO_IN: C74.1 C84.2 R14.1 R15.1 U6.3 | length 3.6
  Top Layer w0.2: C74.1@27.439,14.217 27.564,14.092 28.114,14.092 28.128,14.075 28.128,13.396 U6.3@28.033,13.301 ; R14.1@28.216,14.119 R14.1@28.314,14.217 28.423,14.108 29.118,14.108 R15.1@29.227,14.217 29.227,13.32 C84.2@29.207,13.301
TCXO_VDD: L34.1 U4.47 | length 2
  Top Layer w0.2: L34.1@25.157,16.911 U4.47@25.157,18.915
TX_EN: U1.6 U27.3 U33.3 | length 66.7
  Top Layer w0.1: v3(15.879,10.83) 15.752,10.83 15.776,10.806 U1.6@16.542,10.806 ; v3(16.207,55.951) 16.207,56.571 U33.3@16.288,56.651 ; v5(31.576,41.593) 31.576,40.963 U27.3@31.649,40.89
  Signal Layer 3 w0.1: v3(15.879,10.83) 16.466,10.83 16.598,10.962 16.598,15.726 16.443,15.881 16.443,22.97 18.282,24.809 18.282,34.776 19.332,35.826 24.151,35.826 27.071,38.746 27.071,41.6 27.071,48.937 20.057,55.951 v3(16.207,55.951) ; 27.075,41.6 27.082,41.593 v5(31.576,41.593)
V1_DPDT: C118.2 U11.6 U12.4 | length 8.9
  Top Layer w0.2: v1(23.767,43.745) 23.778,43.734 U12.4@23.778,42.221
  Signal Layer 2 w0.2: v1@17.632,40.826 17.657,40.801 20.862,40.801 23.767,43.706 v1(23.767,43.745)
  other v1: 17.582,40.801
V4: C184.1 C185.1 R33.2 R35.2 U22.6 U23.6 | length 16.2
  Top Layer w0.1: R35.2@50.397,39.5 R33.2@51.286,39.5 52.041,39.5 C184.1@52.184,39.5 ; v3(52.207,39.158) C184.1@52.207,39.501 ; C184.1@52.439,39.502 52.439,39.681 52.441,39.683 52.539,39.683 52.936,40.081 52.936,40.423 U22.6@52.932,40.427 ; C185.1@57.229,31.219 57.362,31.352 57.362,31.904 U23.6@57.752,32.295 ; v3(57.348,30.684) C185.1@57.348,31.219
  Signal Layer 3 w0.1: v3(52.207,39.158) 52.952,39.158 56.357,35.753 56.357,31.674 v3(57.348,30.684)
V4_INV: C128.1 R32.2 R34.2 U13.6 | length 2.9
  Top Layer w0.1: U13.6@62.564,52.448 62.564,53.569 C128.1@62.572,53.577 ; R32.2@62.597,54.381 62.623,54.407 62.623,55.261 R34.2@62.597,55.287 ; C128.1@62.599,53.577 R32.2@62.599,54.407
V4_MCU: R35.1 U1.1 U14.2 | length 94.5
  Top Layer w0.1: v3@15.417,12.806 U1.1@16.542,12.806 ; v5(50.408,38.161) R35.1@50.408,38.639 ; R35.1@50.651,38.65 R35.1@50.662,38.639 ; v5@61.705,58.076 62.32,58.076 U14.2@62.418,57.977
  Signal Layer 1 w0.1: v3(15.412,12.811) 16.24,13.64 34.29,13.64 39.132,18.482 39.132,26.626 39.957,27.451 55.382,27.451 56.682,28.751 56.682,34.351 56.108,34.926 53.643,34.926 v5(50.408,38.161)
  Signal Layer 3 w0.1: v5(50.408,38.161) 53.747,41.501 56.3,41.501 61.257,46.459 61.257,54.411 61.675,54.829 v5@61.675,58.025
  other v5: 61.702,58.072
V4_MCU_INV: R34.1 U14.4 | length 2.3
  Top Layer w0.1: R34.1@63.525,55.148 63.525,57.024 U14.4@63.833,57.332
V_DPDT: C102.2 R23.2 R24.2 U10.6 U12.2 | length 5
  Top Layer w0.3: C102.2@19.277,37.935 R24.2@21.002,37.935 21.02,37.953 21.545,37.953 23.115,39.523 U12.2@23.115,40.002
"VCC_+1.8 V": C213.1 L21.1 L30.1 L33.1 R16.1 U35.5 | length 60
  Top Layer w0.2: R16.1@36.527,17.127 36.559,17.159 v1@36.559,17.518
  Top Layer w0.3: C213.1@12.841,32.485 12.841,32.341 13.041,32.141 C213.1@13.045,32.141 ; U35.5@12.91,31.282 12.945,31.282 13.045,31.382 C213.1@13.045,32.141 ; L30.1@14.565,32.487 14.565,32.341 14.365,32.141 C213.1@13.045,32.141 ; v1(26.114,14.376) 26.119,14.381 L21.1@26.119,15.11
  Signal Layer 1 w0.2: v1(12.851,33.26) 12.851,33.237 11.425,31.812 11.425,21.063 13.438,19.05 v1(14.725,19.05) 14.725,17.708 16.521,15.912 17.729,15.912 18.987,17.17 28.042,17.17 30.321,19.45 35.458,19.45 36.547,18.361 36.554,18.355 36.554,17.739 36.482,17.668 36.559,17.592 36.559,16.907 36.441,16.789 29.667,16.789 27.254,14.376 v1(26.114,14.376)
  other v1: 36.559,17.668
"VCC_+3.3 V": C201.1 L13.1 L24.1 L25.1 L31.1 L32.1 L35.1 R12.1 R13.1 R17.1 U29.5 | length 74
  Top Layer w0.15: v3(22.53,33.63) 23.397,33.63 L25.1@23.439,33.671 ; R17.1@35.698,17.127 35.734,17.163 v1(35.734,17.668)
  Top Layer w0.2: v3(22.707,15.343) 23.248,15.343 23.258,15.352 L24.1@23.499,15.11 ; L13.1@31.498,29.259 31.556,29.201 v3(32.135,29.201)
  Top Layer w0.25: U29.5@10.298,21.219 U29.5@10.389,21.31 ; U29.5@10.4,21.325 C201.1@11.795,21.325 ; C201.1@11.804,21.159 11.954,21.159 C201.1@12.179,21.384 ; v3(12.051,26.23) 12.625,26.23 L32.1@12.634,26.22 ; 12.32,21.325 13.329,21.325 ; L35.1@12.634,24.631 L32.1@12.634,26.041 ; L35.1@12.634,24.673 12.634,24.565 12.859,24.34 13.182,24.34 13.329,24.194 13.329,21.325 ; 13.365,21.325 13.329,21.325 ; 13.365,21.365 15.105,21.365 R12.1@15.183,21.442 15.245,21.38 16.02,21.38 R13.1@16.082,21.442 ; L31.1@14.49,17.337 14.49,17.419 14.265,17.644 v3(13.335,17.644) 13.329,17.65 13.329,21.325
  Top Layer w0.3: C201.1@11.784,21.179 C201.1@11.804,21.159
  Signal Layer 1 w0.15: v3@22.66,15.343 27.154,15.343 28.931,17.12 32.283,17.12 32.832,17.668 v1(35.734,17.668)
  Signal Layer 1 w0.2: v3(13.335,17.644) 13.363,17.615 13.363,17.422 15.456,15.33 v3@22.647,15.33
  Signal Layer 1 w0.3: v3@12.072,26.225 12.45,26.225 13.222,26.997 13.222,32.602 14.249,33.63 v3(22.53,33.63) 23.276,33.63 24.882,32.024 24.882,29.313 25,29.196 32.13,29.196 v3(32.135,29.201)
VCC_SGM_SPDT: C123.1 C131.1 C172.1 C173.1 C211.1 U13.4 U14.5 U22.4 U23.4 U34.5 | length 54.8
  Top Layer w0.15: v5(51.834,42.161) 52.433,42.161 C172.1@52.454,42.182 52.454,41.705 U22.4@52.932,41.227 ; v3(57.357,34.776) 57.357,34.157 C173.1@57.356,34.155 57.356,33.498 U23.4@57.752,33.101 ; U34.5@58.952,58.634 C211.1@60.274,58.634 ; C211.1@60.285,58.644 60.435,58.644 61.039,59.249 61.153,59.249 61.191,59.287 63.166,59.287 63.743,58.71 63.918,58.71 U14.5@64,58.627 ; U13.4@62.562,51.645 62.996,51.211 62.996,50.596 63.238,50.354 C123.1@63.673,50.354 ; C123.1@63.673,50.304 C123.1@63.677,50.3 ; U14.5@64.106,58.627 C131.1@65.395,58.627
  Signal Layer 1 w0.15: v3(57.357,34.776) 57.357,36.638 v5(51.834,42.161) 51.834,52.003 55.158,55.327 61.175,55.327 63.299,55.327 63.714,54.912 v5(63.714,49.537) ; 61.175,55.35 61.175,59.271 v5@61.191,59.287
  other v5: 61.164,59.274
VDD: C1.1 C2.1 C3.2 C5.1 L1.2 L2.1 U1.5 U1.16 U1.21 U1.30 | length 21.5
  Top Layer w0.15: L2.1@14.386,6.982 14.386,7.06 14.811,7.485 14.811,8.359 15.016,8.564 16.533,8.564 17.175,9.206 ; C3.2@15.253,11.206 U1.5@16.542,11.206 17.073,11.206 17.175,11.104 17.175,9.206 ; U1.16@19.245,8.509 19.245,9.161 19.207,9.199 19.214,9.206 ; U1.16@19.247,8.501 19.247,7.541 C1.1@19.284,7.504 ; U1.30@21.331,12.801 21.031,12.801 20.942,12.712 20.942,9.206 ; U1.30@21.542,12.806 22.409,12.806 C2.1@22.55,12.947 ; L1.2@22.652,8.001 22.652,8.151 22.367,8.437 22.367,8.921 C5.1@22.515,9.07 ccw(c22.379,9.07) 22.379,9.206 U1.21@21.542,9.206 20.942,9.206 ; 17.175,9.206 19.214,9.206 ; 19.214,9.206 20.942,9.206
VDD_DPDT: C86.2 C103.2 C119.2 C122.2 C215.1 U10.4 U11.4 U12.5 U36.5 | length 23
  Top Layer w0.25: v1(16.407,37.926) 16.412,37.931 17.247,37.931 C119.2@17.252,37.935
  Top Layer w0.3: C103.2@19.838,40.16 C86.2@20.738,40.16 21.498,40.16 v1@21.507,40.151 ; v1@21.582,40.201 21.598,40.217 C122.2@21.598,41.832 ; C122.2@21.606,41.915 21.639,41.947 U12.5@22.466,41.947
  Top Layer w0.4: C215.1@27.442,38.4 27.442,39.742 U36.5@27.45,39.75 ; C215.1@27.475,38.3 v1(28.65,38.3)
  Signal Layer 1 w0.3: v1(16.407,37.926) 16.407,39.601 16.957,40.151 v1@21.532,40.151 ; v1@21.6,40.15 27.75,40.15 28.65,39.25 v1(28.65,38.3)
  other v1: 21.557,40.151
VDDA: C4.1 L2.2 U1.12 | length 3.4
  Top Layer w0.2: L2.2@15.236,6.982 15.3,7.046 C4.1@15.97,7.046 16.025,6.991 16.745,6.991 17.642,7.888 U1.12@17.642,8.506
pads on no net: U1.13 U1.17 U1.18 U1.19 U1.20 U2.6 U3.6 U4.4 U4.5 U4.6 U4.7 U4.13 U4.19 U4.20 U4.24 U4.25 U4.28 U4.29 U4.40 U4.41 U4.42 U4.43 U4.44 U4.50 U4.51 U4.52 U4.53 U4.63 U5.6 U6.1 u8. U12.1 U14.1 U15.7 u18. u19. u24. U26.4 U27.4 U29.4 U30.4 U31.4 U32.4 U34.4 U35.4 U36.4

## Polygon pours and split planes (outlines as drawn)
GND on Bottom Layer "NONET_L-01_P-001" (solid, pour order 1): 74.36,63.351 74.392,54.6 70.107,54.6 70.107,50.15 74.407,50.15 74.407,0 0.209,0 -0.042,63.401
GND on Signal Layer 2 "NONET_L-01_P-001" (solid, remove dead copper, pour order 4): 0.004,64.251 0.004,1.051 74.407,1.051 74.407,64.251
GND on Top Layer "NONET_L-01_P-TOP" (hatched Horizontal grid 0.508 track 0.508, pour order 6): 0,63.398 0.076,63.322 74.397,63.322 74.397,0.152 74.092,-0.152 0.102,-0.152
GND on Internal Plane 1 (split plane): 73.897,54.647 70.107,54.647 70.008,54.637 69.912,54.608 69.824,54.561 69.746,54.498 69.683,54.42 69.636,54.332 69.607,54.236 69.597,54.137 69.597,50.154 69.607,50.055 69.636,49.959 69.683,49.871 69.746,49.793 69.824,49.73 69.912,49.683 70.008,49.654 70.107,49.644 73.897,49.644 73.897,0.51 0.515,0.51 0.515,0.851 0.515,62.891 73.897,62.891

## Keep-outs
Keep-Out Layer:
  lines w0.1: 74.407,50.15 74.407,0 0.004,0 0.004,0.851 0.004,63.401 74.407,63.401 74.407,54.125 ; 74.407,50.154 70.107,50.154 70.107,54.137 74.407,54.137

## Other copper
Top Layer:
  drawing of 311 lines, arcs and shapes, not listed
Signal Layer 2:
  pour cut-out: 74.407,54.137 70.107,54.137 70.107,50.154 74.407,50.154
  pour cut-out: 25.625,13.725 28.682,13.725 28.682,11.654 25.625,11.654
  pour cut-out: 8.13,51.529 8.13,47.426 12.684,47.426 12.684,51.529
  pour cut-out: 36.244,19.893 41.161,19.893 41.161,17.451 36.204,17.451
  pour cut-out: 19.655,3.063 19.655,3.062 16.713,3.062 16.713,6.692 19.668,6.692
  pour cut-out: 8.998,7.313 8.998,3.825 13.552,3.825 13.552,7.382
Signal Layer 3:
  pour cut-out: 17.269,12.966 19.408,12.966 19.408,11.819 19.181,11.592 17.276,11.592
Internal Plane 1 (plane layer: these items are gaps in the copper):
  region: 9.032,7.599 13.621,7.599 13.621,3.501 9.018,3.501
  region: 37.643,17.53 37.643,19.902 40.488,19.902 40.488,17.52
  region: 15.579,6.614 19.376,6.614 19.376,2.516 15.564,2.516

## Silkscreen, mask and mechanical layers (free items; w line width, h text height)
Top Overlay:
  drawing of 32 lines, arcs and shapes, not listed
  text "信通学院CRFICS" at 38.875,45.175 h1.5
  text "LYY_20261025" at 40.075,43.925 h1.5
  text "超高频无源物联网可重构端机" at 33.75,42.55 h1.5
Top Solder:
  rectangle: 14.137,47.58 17.276,49.866
  region: 68.757,37.737 59.334,37.737 59.334,37.137 68.757,37.137
  region: 59.937,9.17 59.937,37.734 59.337,37.734 59.337,9.17
  region: 68.754,9.155 68.754,37.734 68.154,37.734 68.154,9.155
  region: 68.74,8.739 59.337,8.739 59.337,8.139 68.74,8.139
  region: 66.798,55.386 74.178,55.386 74.178,54.316 66.798,54.316
  region: 66.798,48.593 74.188,48.593 74.188,49.954 66.798,49.954
  region: 6.21,62.876 6.21,43.776 5.41,43.776 5.41,62.876
  region: 5.332,63.151 70.957,63.151 70.957,61.951 5.332,61.951
  region: 70.861,55.474 70.861,62.951 70.061,62.951 70.061,55.474
  region: 6.21,1.251 6.21,20.482 5.41,20.482 5.41,1.251
  region: 70.861,1.238 70.861,48.425 70.061,48.425 70.061,1.238
  region: 5.507,0.851 70.891,0.851 70.891,2.051 5.507,2.051
Bottom Solder:
  region: 0.004,63.401 74.407,63.401 74.407,0 0.004,0

## Dimensions
0,0.85 to 74.416,0.851 on Top Overlay
0.004,0 to 0.004,63.401 on Top Overlay